# Altium PCB Junction_Box.PcbDoc (part 2 of 2)
Units mm, origin at the board's own origin, x right, y up, seen from the top; angles counter-clockwise.
Board outline 50.93 x 35.69 mm, 2 copper layers (Top Layer, Bottom Layer), stack 1.448 mm thick; 47 components, 35 nets, 148 pads, 173 vias.
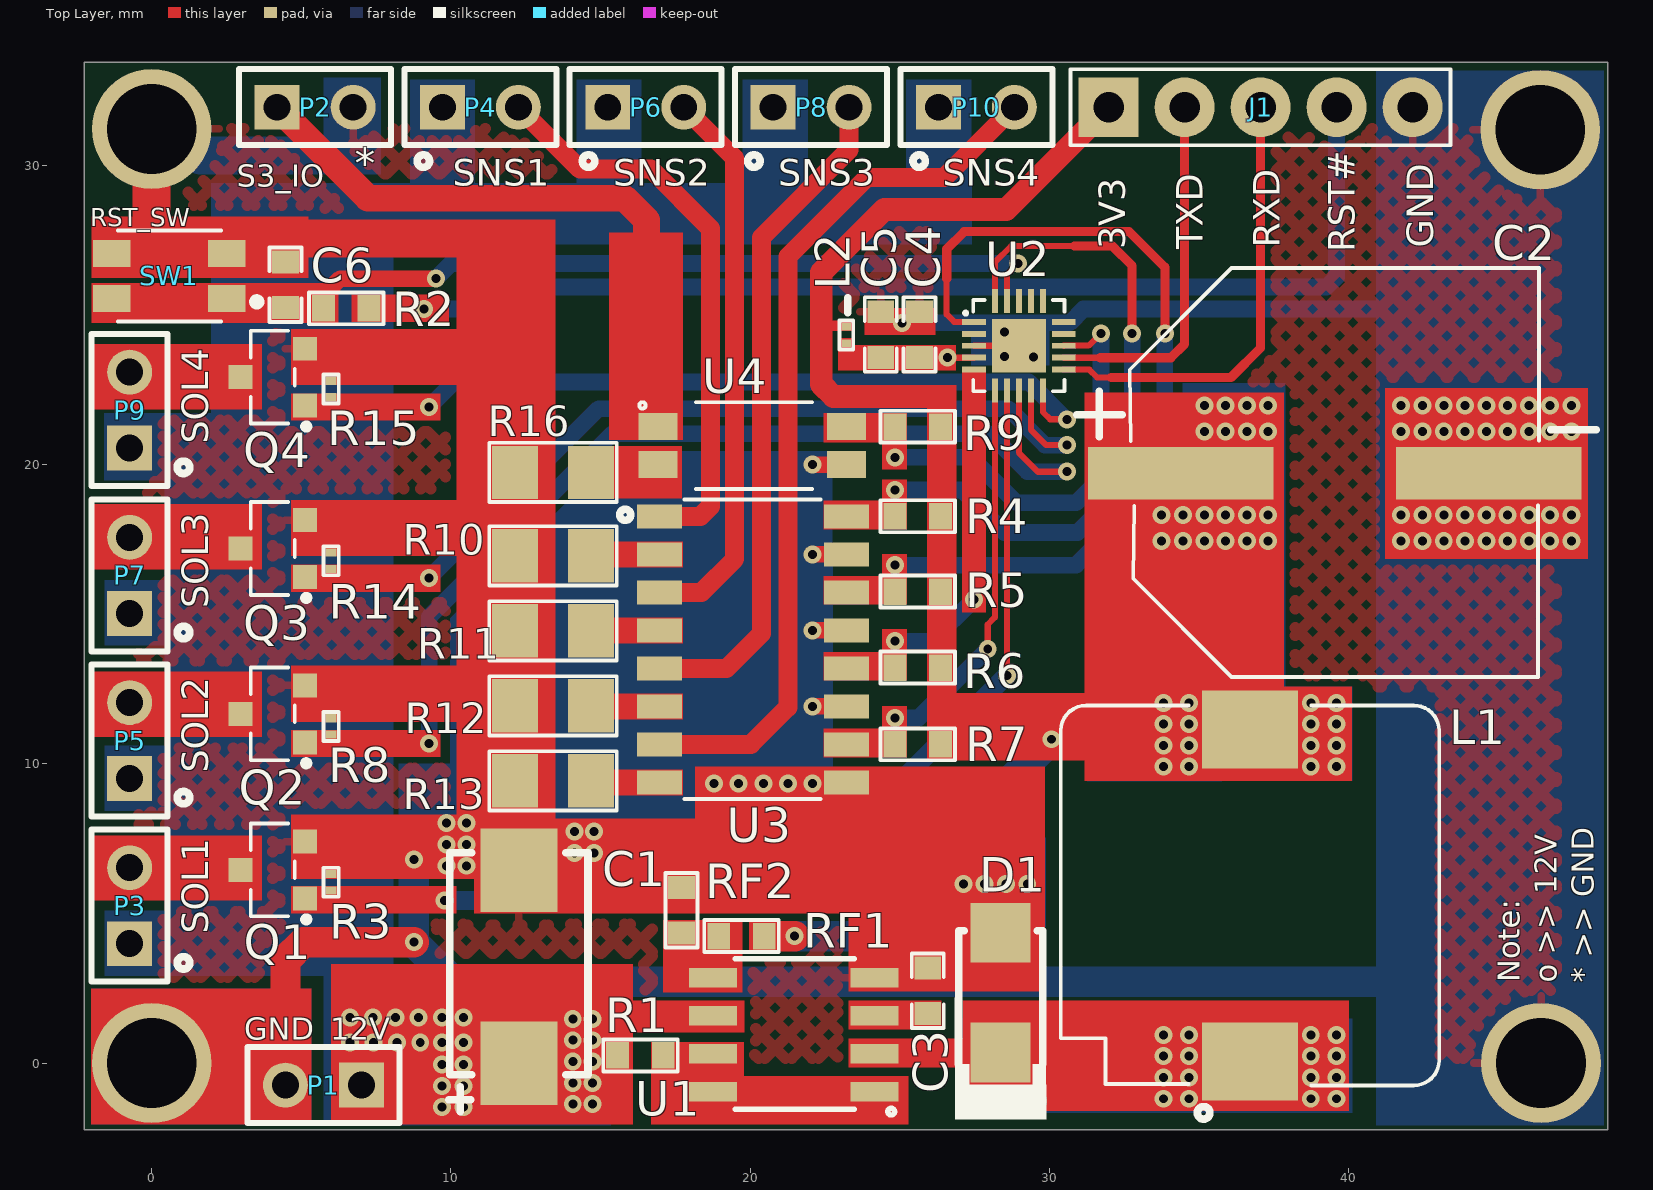
[diagram p0: Top Layer view]

## Other copper (continued)
Top Layer: (continued)
  pour cut-out: 30.302,12.573 30.302,-1.956 43.053,-1.956 43.053,12.573
Bottom Layer:
  region net GND: 48.539,33.172 40.919,33.172 40.919,-2.083 48.539,-2.083
  rectangle net GND: 27.381,23.316 29.997,25.018
  rectangle net 12V: 5.994,-2.083 15.342,1.88
  rectangle net GND: 5.74,29.693 7.671,32.944
  rectangle net GND: 8.255,6.223 19.558,10.008
  rectangle net 3V3: 34.442,9.474 37.897,22.733
  rectangle net NetD1_1: 26.845,-1.677 40.132,1.481
  rectangle net 3V3: 33.292,9.423 40.132,12.581
  rectangle net 12V: 2.007,27.356 27.407,29.413
  rectangle net 12V: 1.981,20.218 8.077,29.413
  rectangle net GND: 15.626,8.484 22.758,20.447
  rectangle net 12V: 25.212,27.356 27.396,32.868
  rectangle net 12V: 19.751,27.381 21.935,32.868
  rectangle net 12V: 14.188,27.356 16.373,32.868
  rectangle net 12V: 8.626,27.534 10.81,32.868
  rectangle net 12V: 0.432,2.911 8.077,21.656
  rectangle net GND: -2.032,-2.057 5.334,2.489
  rectangle net 12V: 5.74,-2.057 8.077,21.656
  region net 12V: 4.085,2.911 4.085,5.095 -1.575,5.095 -1.575,2.911
  region net 12V: 4.085,8.431 4.085,10.615 -1.575,10.615 -1.575,8.431
  region net 12V: 4.085,13.951 4.085,16.136 -1.575,16.136 -1.575,13.951
  region net 12V: 4.11,19.472 4.11,21.717 -1.6,21.717 -1.6,19.472
  region net GND: 20.521,6.223 22.758,8.46 22.758,16.596 19.385,16.596 19.385,6.223
  region net GND: 15.57,20.447 9.982,14.859 9.982,7.46 16.861,7.46 16.861,20.447
  region net GND: 28.077,7.536 26.434,5.892 26.434,4.554 29.87,4.554 29.87,7.536
  region net 3V3: 34.783,19.797 31.272,16.286 31.272,9.423 35.763,9.423 35.763,19.797

## Silkscreen, mask and mechanical layers (free items; w line width, h text height)
Top Overlay:
  lines w0.254: 0.854,3.362 ccw(c1.062,3.348) 0.856,3.376 ; 0.854,8.882 ccw(c1.062,8.869) 0.856,8.896 ; 0.854,14.402 ccw(c1.062,14.389) 0.856,14.416 ; 0.854,19.922 ccw(c1.062,19.909) 0.856,19.937 ; 9.089,30.351 ccw(c9.076,30.144) 9.103,30.35 ; 14.614,30.351 ccw(c14.6,30.144) 14.628,30.35 ; 20.138,30.351 ccw(c20.125,30.144) 20.152,30.35 ; 23.266,25.07 23.266,25.578 ; 25.663,30.351 ccw(c25.649,30.144) 25.677,30.35
  text "*" at 6.782,29.574 h1.02
  text "S3_IO" at 2.845,29.032 h1.27
  text "SNS1" at 10.053,29.021 h1.52
  text "SNS2" at 15.426,29.021 h1.52
  text "SNS3" at 20.94,29.021 h1.52
  text "SNS4" at 26.438,29.021 h1.52
  text "RST_SW" at -2.057,27.762 h1.02
  text "RXD" at 37.998,27.254 h1.52 r90
  text "GND" at 43.129,27.254 h1.52 r90
  text "3V3" at 32.842,27.203 h1.52 r90
  text "TXD" at 35.433,27.203 h1.52 r90
  text "RST#" at 40.513,27.087 h1.52 r90
  text "SOL4" at 2.184,20.699 h1.52 r90
  text "SOL3" at 2.184,15.206 h1.52 r90
  text "SOL2" at 2.184,9.696 h1.52 r90
  text "SOL1" at 2.184,4.327 h1.52 r90
  text "Note:" at 45.969,2.703 h1.27 r90
  text "o >> 12V" at 47.211,2.688 h1.27 r90
  text "* >> GND" at 48.445,2.679 h1.27 r90
  text "GND" at 3.095,0.533 h1.27
  text "12V" at 5.969,0.533 h1.27
Bottom Overlay:
  drawing of 3083 lines, arcs and shapes, not listed
  text "*" at 6.325,29.981 h1.02
  text "SNS1" at 11.316,27.21 h1.52 r270
  text "SNS2" at 16.84,27.21 h1.52 r270
  text "SNS3" at 22.365,27.21 h1.52 r270
  text "SNS4" at 27.889,27.21 h1.52 r270
  text "S3_IO" at 3.344,27.019 h1.52 r270
  text "SOL4" at 3.996,22.149 h1.52
  text "SOL3" at 3.996,16.629 h1.52
  text "SOL2" at 3.996,11.108 h1.52
  text "ZERO CARBON FOOTPRINT" at 35.044,8.771 h0.97
  text "SOL1" at 3.996,5.588 h1.52
  text "Note:" at 43.713,0.432 h1.27
  text "o >> 12V" at 43.728,-0.81 h1.27
  text "* >> GND" at 43.738,-2.043 h1.27
Board Outline:
  the board outline again, w0.254
Fabrication:
  drawing of 323 lines, arcs and shapes, not listed
  text "Layer" at 60.541,29.085 h1.52
  text "Name" at 70.953,29.085 h1.52
  text "Material" at 94.568,29.085 h1.52
  text "Thickness" at 116.406,29.085 h1.52
  text "Constant" at 132.912,29.085 h1.52
  text "Board Layer Stack" at 147.387,29.085 h1.52
  text "Top Overlay" at 70.953,26.037 h1.52
  text "Top Solder" at 70.953,22.989 h1.52
  text "Solder Resist" at 94.568,22.989 h1.52
  text "3.00mil" at 116.406,22.989 h1.52
  text "3.5" at 132.912,22.989 h1.52
  text "1" at 60.541,19.941 h1.52
  text "Top Layer" at 70.953,19.941 h1.52
  text "10.00mil" at 116.406,19.941 h1.52
  text "Dielectric 1" at 70.953,16.893 h1.52
  text "FR-4" at 94.568,16.893 h1.52
  text "37.00mil" at 116.406,16.893 h1.52
  text "4.8" at 132.912,16.893 h1.52
  text "2" at 60.541,13.845 h1.52
  text "Bottom Layer" at 70.953,13.845 h1.52
  text "10.00mil" at 116.406,13.845 h1.52
  text "Bottom Solder" at 70.953,10.797 h1.52
  text "Solder Resist" at 94.568,10.797 h1.52
  text "3.00mil" at 116.406,10.797 h1.52
  text "3.5" at 132.912,10.797 h1.52
  text "Bottom Overlay" at 70.953,7.749 h1.52
  text "Note:" at -1.199,-7.665 h1.52
  text "Thickness of PCB is set to 1.6mm." at -1.346,-9.804 h1.52
Drill Drawing:
  circle w0.254: c0.473,46.884 r0.847
  lines w0.254: -0.374,42.651 0.05,42.651 0.473,42.227 0.896,42.651 1.32,42.651 0.896,43.074 1.32,43.497 0.896,43.497 0.473,43.921 0.05,43.497 -0.374,43.497 0.05,43.074 -0.374,42.651 ; -0.374,49.847 1.32,49.847 1.32,51.541 -0.374,51.541 -0.374,49.847 ; -0.374,55.351 1.32,55.351 0.473,53.657 -0.374,55.351
  lines w0.381: -1.892,41.084 322.832,41.084 ; -1.892,56.325 322.832,56.325 ; 12.1,37.274 12.1,60.134 ; 27.336,37.274 27.336,60.134 ; 55.776,37.274 55.776,60.134 ; 68.625,37.274 68.625,60.134 ; 87.263,37.274 87.263,60.134 ; 125.352,37.274 125.352,60.134 ; 140.334,37.274 140.334,60.134 ; 159.277,37.274 159.277,60.134 ; 175.783,37.274 175.783,60.134 ; 197.469,37.274 197.469,60.134 ; 231.342,37.274 231.342,60.134 ; 265.216,37.274 265.216,60.134 ; 287.206,37.274 287.206,60.134 ; -1.892,37.274 322.832,37.274 322.832,60.134 -1.892,60.134 -1.892,37.274
  text "Symbol" at 0.394,57.468 h1.83
  text "Count" at 13.243,57.468 h1.83
  text "Hole Size" at 28.479,57.468 h1.83
  text "Plated" at 56.919,57.468 h1.83
  text "Hole Type" at 69.768,57.468 h1.83
  text "Drill Layer Pair" at 88.406,57.468 h1.83
  text "Via/Pad" at 126.495,57.468 h1.83
  text "Pad Shape" at 141.477,57.468 h1.83
  text "Template" at 160.42,57.468 h1.83
  text "Description" at 176.926,57.468 h1.83
  text "Hole Tolerance (+)" at 198.612,57.468 h1.83
  text "Hole Tolerance (-)" at 232.485,57.468 h1.83
  text "Hole Length" at 266.359,57.468 h1.83
  text "Routed Path Length" at 288.349,57.468 h1.83
  text "4" at 13.243,53.657 h1.52
  text "118.11mil (3.000mm)" at 28.479,53.657 h1.52
  text "PTH" at 56.919,53.657 h1.52
  text "Round" at 69.768,53.657 h1.52
  text "Top Layer - Bottom Layer" at 88.406,53.657 h1.52
  text "Pad" at 126.495,53.657 h1.52
  text "Rounded" at 141.477,53.657 h1.52
  text "c400h300" at 160.42,53.657 h1.52
  text "-" at 266.359,53.657 h1.52
  text "-" at 288.349,53.657 h1.52
  text "5" at 13.243,49.847 h1.52
  text "40.16mil (1.020mm)" at 28.479,49.847 h1.52
  text "PTH" at 56.919,49.847 h1.52
  text "Round" at 69.768,49.847 h1.52
  text "Top Layer - Bottom Layer" at 88.406,49.847 h1.52
  text "Pad" at 126.495,49.847 h1.52
  text "(Mixed)" at 141.477,49.847 h1.52
  text "(Mixed)" at 160.42,49.847 h1.52
  text "-" at 266.359,49.847 h1.52
  text "-" at 288.349,49.847 h1.52
  text "20" at 13.243,46.038 h1.52
  text "35.43mil (0.900mm)" at 28.479,46.038 h1.52
  text "PTH" at 56.919,46.038 h1.52
  text "Round" at 69.768,46.038 h1.52
  text "Top Layer - Bottom Layer" at 88.406,46.038 h1.52
  text "Pad" at 126.495,46.038 h1.52
  text "(Mixed)" at 141.477,46.038 h1.52
  text "(Mixed)" at 160.42,46.038 h1.52
  text "-" at 266.359,46.038 h1.52
  text "-" at 288.349,46.038 h1.52
  text "173" at 13.243,42.227 h1.52
  text "11.81mil (0.300mm)" at 28.479,42.227 h1.52
  text "PTH" at 56.919,42.227 h1.52
  text "Round" at 69.768,42.227 h1.52
  text "Top Layer - Bottom Layer" at 88.406,42.227 h1.52
  text "Via" at 126.495,42.227 h1.52
  text "Rounded" at 141.477,42.227 h1.52
  text "(Mixed)" at 160.42,42.227 h1.52
  text "-" at 266.359,42.227 h1.52
  text "-" at 288.349,42.227 h1.52
  text "202 Total" at 13.243,38.417 h1.52

## Dimensions
-2.261,-2.235 to 48.666,-2.235 on Dimension
-2.261,33.452 to -2.261,-2.235 on Dimension